# Altium PCB LiIon Charger Protection Board.PcbDoc (part 2 of 2)
Units mil, origin at the board's own origin, x right, y up, seen from the top; angles counter-clockwise.
Board outline 2165.35 x 1377.95 mil, 2 copper layers (Top Layer, Bottom Layer); 64 components, 35 nets, 184 pads, 145 vias.
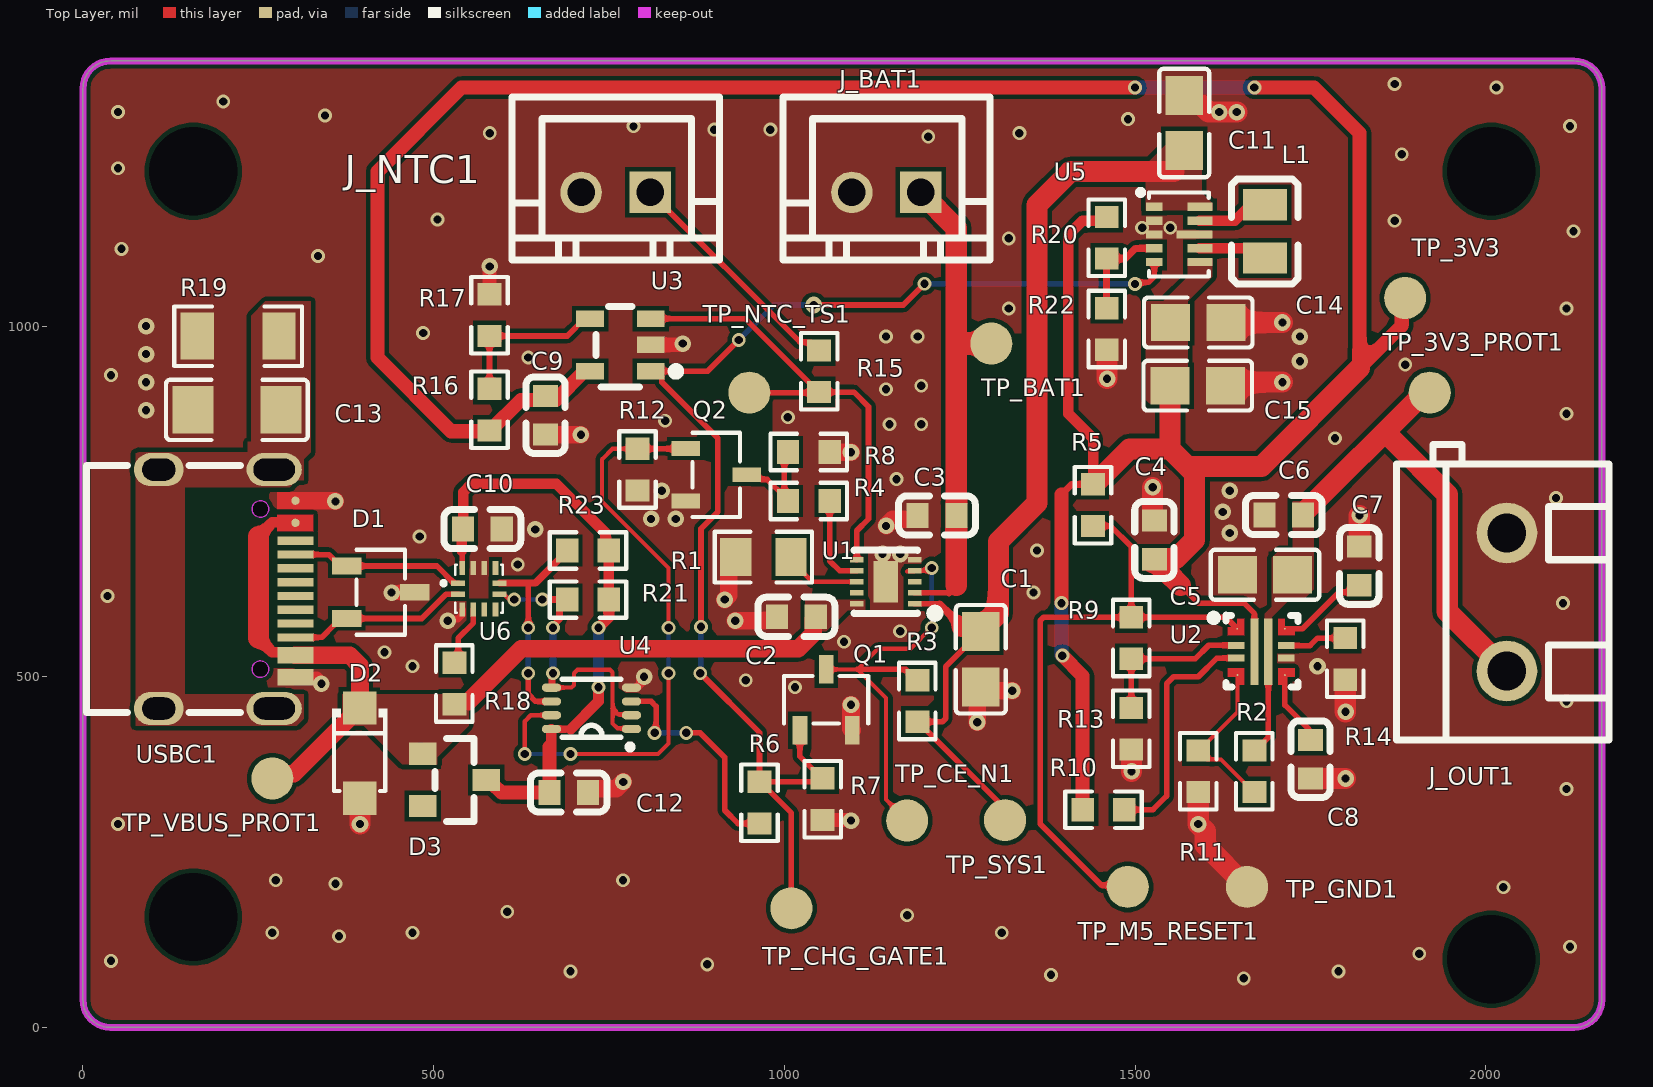
[diagram p0: Top Layer view]

## Via types
v1: diameter 19.68, hole 11.81, Top Layer to Bottom Layer, 99 vias
v2: diameter 23.62, hole 11.81, Top Layer to Bottom Layer, 46 vias

## Nets (pads, with @x,y where several pads share a name; then routed paths per layer and width w, separated by ;. In a path a pad name is that pad's centre, name@x,y a point inside that pad or via, vN(x,y) a via of type N, cw(c..) or ccw(c..) an arc to the next point about the centre after c; other vN are vias at no path point) (continued)
SYS: (continued)
  Top Layer w8: U1.1 1220.98,604.02 ; C1.2 1280,563.19 1257.42,540.61 1256.24,540.61 1230,514.37 1230,440.54 1225.31,435.85 R3.2 1190.69,435.85 1304.61,321.93 1304.61,305.46 TP_SYS1.1
  Top Layer w10: 1220.98,604.02 1253.4,571.6
  Top Layer w20: C11.2@1563.74,1243.74 C11.2
  Top Layer w30: 1253.4,571.6 C1.2@1287.78,571.6 ; C1.2 1286.91,571.28 1286.91,572.46 1305,590.55 1305,692.98 1360,747.98 1360,1172.43 1407.57,1220 1555.11,1220
TP_M5_RESET: R5.2 R9.2 TP_M5_RESET1.1 U2.1 | length 908.7
  Top Layer w8: R5.2 1465,715 1494.56,685.45 R9.2 ; TP_M5_RESET1.1 1487.31,202.76 1452.24,202.76 1364.83,290.17 1364.83,580.15 1369.52,584.83 R9.2 ; U2.1 1629.24,584.83 R9.2
TP_STAT1: U1.9
TP_STAT2: U1.3
USB_SHIELD: C13.2 R19.2 USBC1.1 USBC1.2 USBC1.3 USBC1.4
VBUS_PROT: C2.2 D2.1 D3.1 R18.1 TP_VBUS_PROT1.1 U1.10 USBC1.A4B9 USBC1.B4A9 | length 1199
  Top Layer w10: C2.2 1044.67,587.48 C2.2@1055.42,598.23
  Top Layer w15: 250,555 270.19,534.81 298.66,534.81 USBC1.B4A9 ; 250,700 270,720 295,720 295.51,719.49 USBC1.A4B9
  Top Layer w25: TP_VBUS_PROT1.1 276.7,361.7 300.74,361.7 D2.1 395,455.96 395,515.86 380.36,530.5 USBC1.B4A9 ; D3.1@481.31,393.56 D3.1 D3.1@488.49,390.31 ; R18.1 532.93,464.23 549.23,464.23 625,540 1020,540 1041.43,561.43 1041.43,582.26 C2.2
  Top Layer w30: 250,555 250,700
VDD_CC: C10.2 C12.2 D3.3 R21.1 R23.2 U4.8 U6.12 | length 857.3
  Top Layer w8: 540,680 540.93,679.07 U6.12
  Top Layer w10: 665,400 667.91,402.91 ; U4.8 695.47,425.47
  Top Layer w15: 540,680 540,708.52 C10.2 542,763.21 553.79,775 675,775 745,705 745,684.66 R23.2 R21.1 750,609.66 750,585 v1(735,570) ; 667.91,402.91 U4.8 ; 695.47,425.47 735,465 v1(735,485)
  Top Layer w20: D3.3 579.04,352.91 584.79,347.16 584.79,346.72 596.51,335 C12.2 ; C12.2@664.88,345 664.88,400
  Bottom Layer w15: v1(735,485) v1(735,570)
VHOT_REF: R16.1 R17.2 U3.4 | length 228.9
  Top Layer w8: R16.1 R17.2 690.39,985.85 715.06,1010.52 U3.4
pads on no net: D3.2 U6.5 U6.6 U6.9 USBC1.A6 USBC1.A7 USBC1.A8 USBC1.B6 USBC1.B7 USBC1.B8

## Polygon pours and split planes (outlines as drawn)
GND on Top Layer "NONET_L-01_P-001" (solid, remove dead copper, pour order 19): 0,1430 20,1410 2245,1410 2245,75 2170,0 0,0
USB_SHIELD on Top Layer "NONET_L-01_P-001" (solid, remove dead copper, pour order 17): 75,430 150,430 145,435 145,820 80,820 75,825 75,790
GND on Top Layer "NONET_L-01_P-001" (solid, remove dead copper, pour order 16): 60,1035 200,1035 200,845 195,840 185,840 60,840
GND on Top Layer "NONET_L-01_P-001" (solid, remove dead copper, pour order 15): 1775,530 1775,510 1820,510 1820,485 1815,480 1810,485 1745,485 1745,520 1705,520 1705,530 1725,530
GND on Top Layer "NONET_L-01_P-001" (solid, remove dead copper, pour order 14): 556.68,645 556.68,680 560,680 580,700 580,730 645,730 655,720 655,680 595,680 575,660 575,645
GND on Top Layer "NONET_L-01_P-001" (solid, remove dead copper, pour order 13): 770,780 885,780 885,735 860,710 795,710 795,720 770,745
GND on Top Layer "NONET_L-01_P-001" (solid, remove dead copper, pour order 12): 1125,605 1165,605 1165,660 1195,660 1195,690 1125,690
GND on Top Layer "NONET_L-01_P-001" (solid, remove dead copper, pour order 11): 1565,1155 1565,1135 1610,1135 1610,1125 1495,1125 1495,1155
GND on Top Layer "NONET_L-01_P-001" (solid, remove dead copper, pour order 10): 1675,620 1675,710 1680,715 1700,715 1700,755 1615,755 1615,620
SYS on Top Layer "NONET_L-01_P-001" (solid, remove dead copper, pour order 0): 1545,1260 1595,1260 1595,1190 1610,1175 1610,1165 1515,1165 1515,1230
GND on Top Layer "NONET_L-01_P-001" (solid, remove dead copper, pour order 9): 1650,1030 1750,1030 1750,915 1740,905 1650,905
VBUS_PROT on Top Layer "NONET_L-01_P-001" (solid, remove dead copper, pour order 8): 1030,610 1115,610 1115,595 1090,595 1060,565 1030,565
3V3 on Top Layer "NONET_L-01_P-001" (solid, remove dead copper, pour order 2): 1575,1095 1610,1095 1610,1070 1575,1035 1575,890 1520,890 1515,895 1515,1035 1540,1035 1575,1070
VBUS_PROT on Top Layer "NONET_L-01_P-001" (solid, remove dead copper, pour order 7): 370,475 550,475 550,430 505,385 505,375 455,375 400,430 370,430
USB_SHIELD on Top Layer "NONET_L-01_P-001" (solid, remove dead copper, pour order 6): 75,810 85,820 310,820 310,785 295,770 75,770
USB_SHIELD on Top Layer "NONET_L-01_P-001" (solid, remove dead copper, pour order 5): 325,1035 325,820 315,810 315,780 245,780 235,790 235,835 240,835 240,850 240,1015 260,1035 240,1015 260,1035
USB_SHIELD on Top Layer "NONET_L-01_P-001" (solid, remove dead copper, pour order 4): 75,475 315,475 315,440 305,430 75,430
3V3_PROT on Top Layer "NONET_L-01_P-001" (solid, remove dead copper, pour order 3): 1725,750 1725,680 1705,680 1695,670 1695,600 1685,590 1685,490 1695,490 1695,585 1720,610 1740,610 1755,625 1755,715 1755,750
GND on Bottom Layer "NONET_L-01_P-001" (solid, remove dead copper, pour order 18): 0,1425 2340,1425 2375,1390 2220,1235 2220,0 0,0 0,1435

## Keep-outs
Keep-Out Layer:
  the board outline again, w10

## Other copper
Top Layer:
  pour cut-out: 835,930 840.72,935.72 890.72,935.72 955,1000 1030,925 1030,905 994.73,905 983.36,893.63 983.36,798.36 980,795 970.62,804.38 919.85,804.38 919.85,811.01 835.24,895.62 835.24,946.31

## Silkscreen, mask and mechanical layers (free items; w line width, h text height)
Mechanical 1:
  the board outline again, w10